# Altium PCB Industrial_IOT_Dev_Brd-v2.0.PcbDoc (part 3 of 5)
Units mil, origin at the board's own origin, x right, y up, seen from the top; angles counter-clockwise.
Board outline 3543.31 x 4724.41 mil, 2 copper layers (Top Layer, Bottom Layer), stack 61.889 mil thick; 159 components, 96 nets, 479 pads, 141 vias.
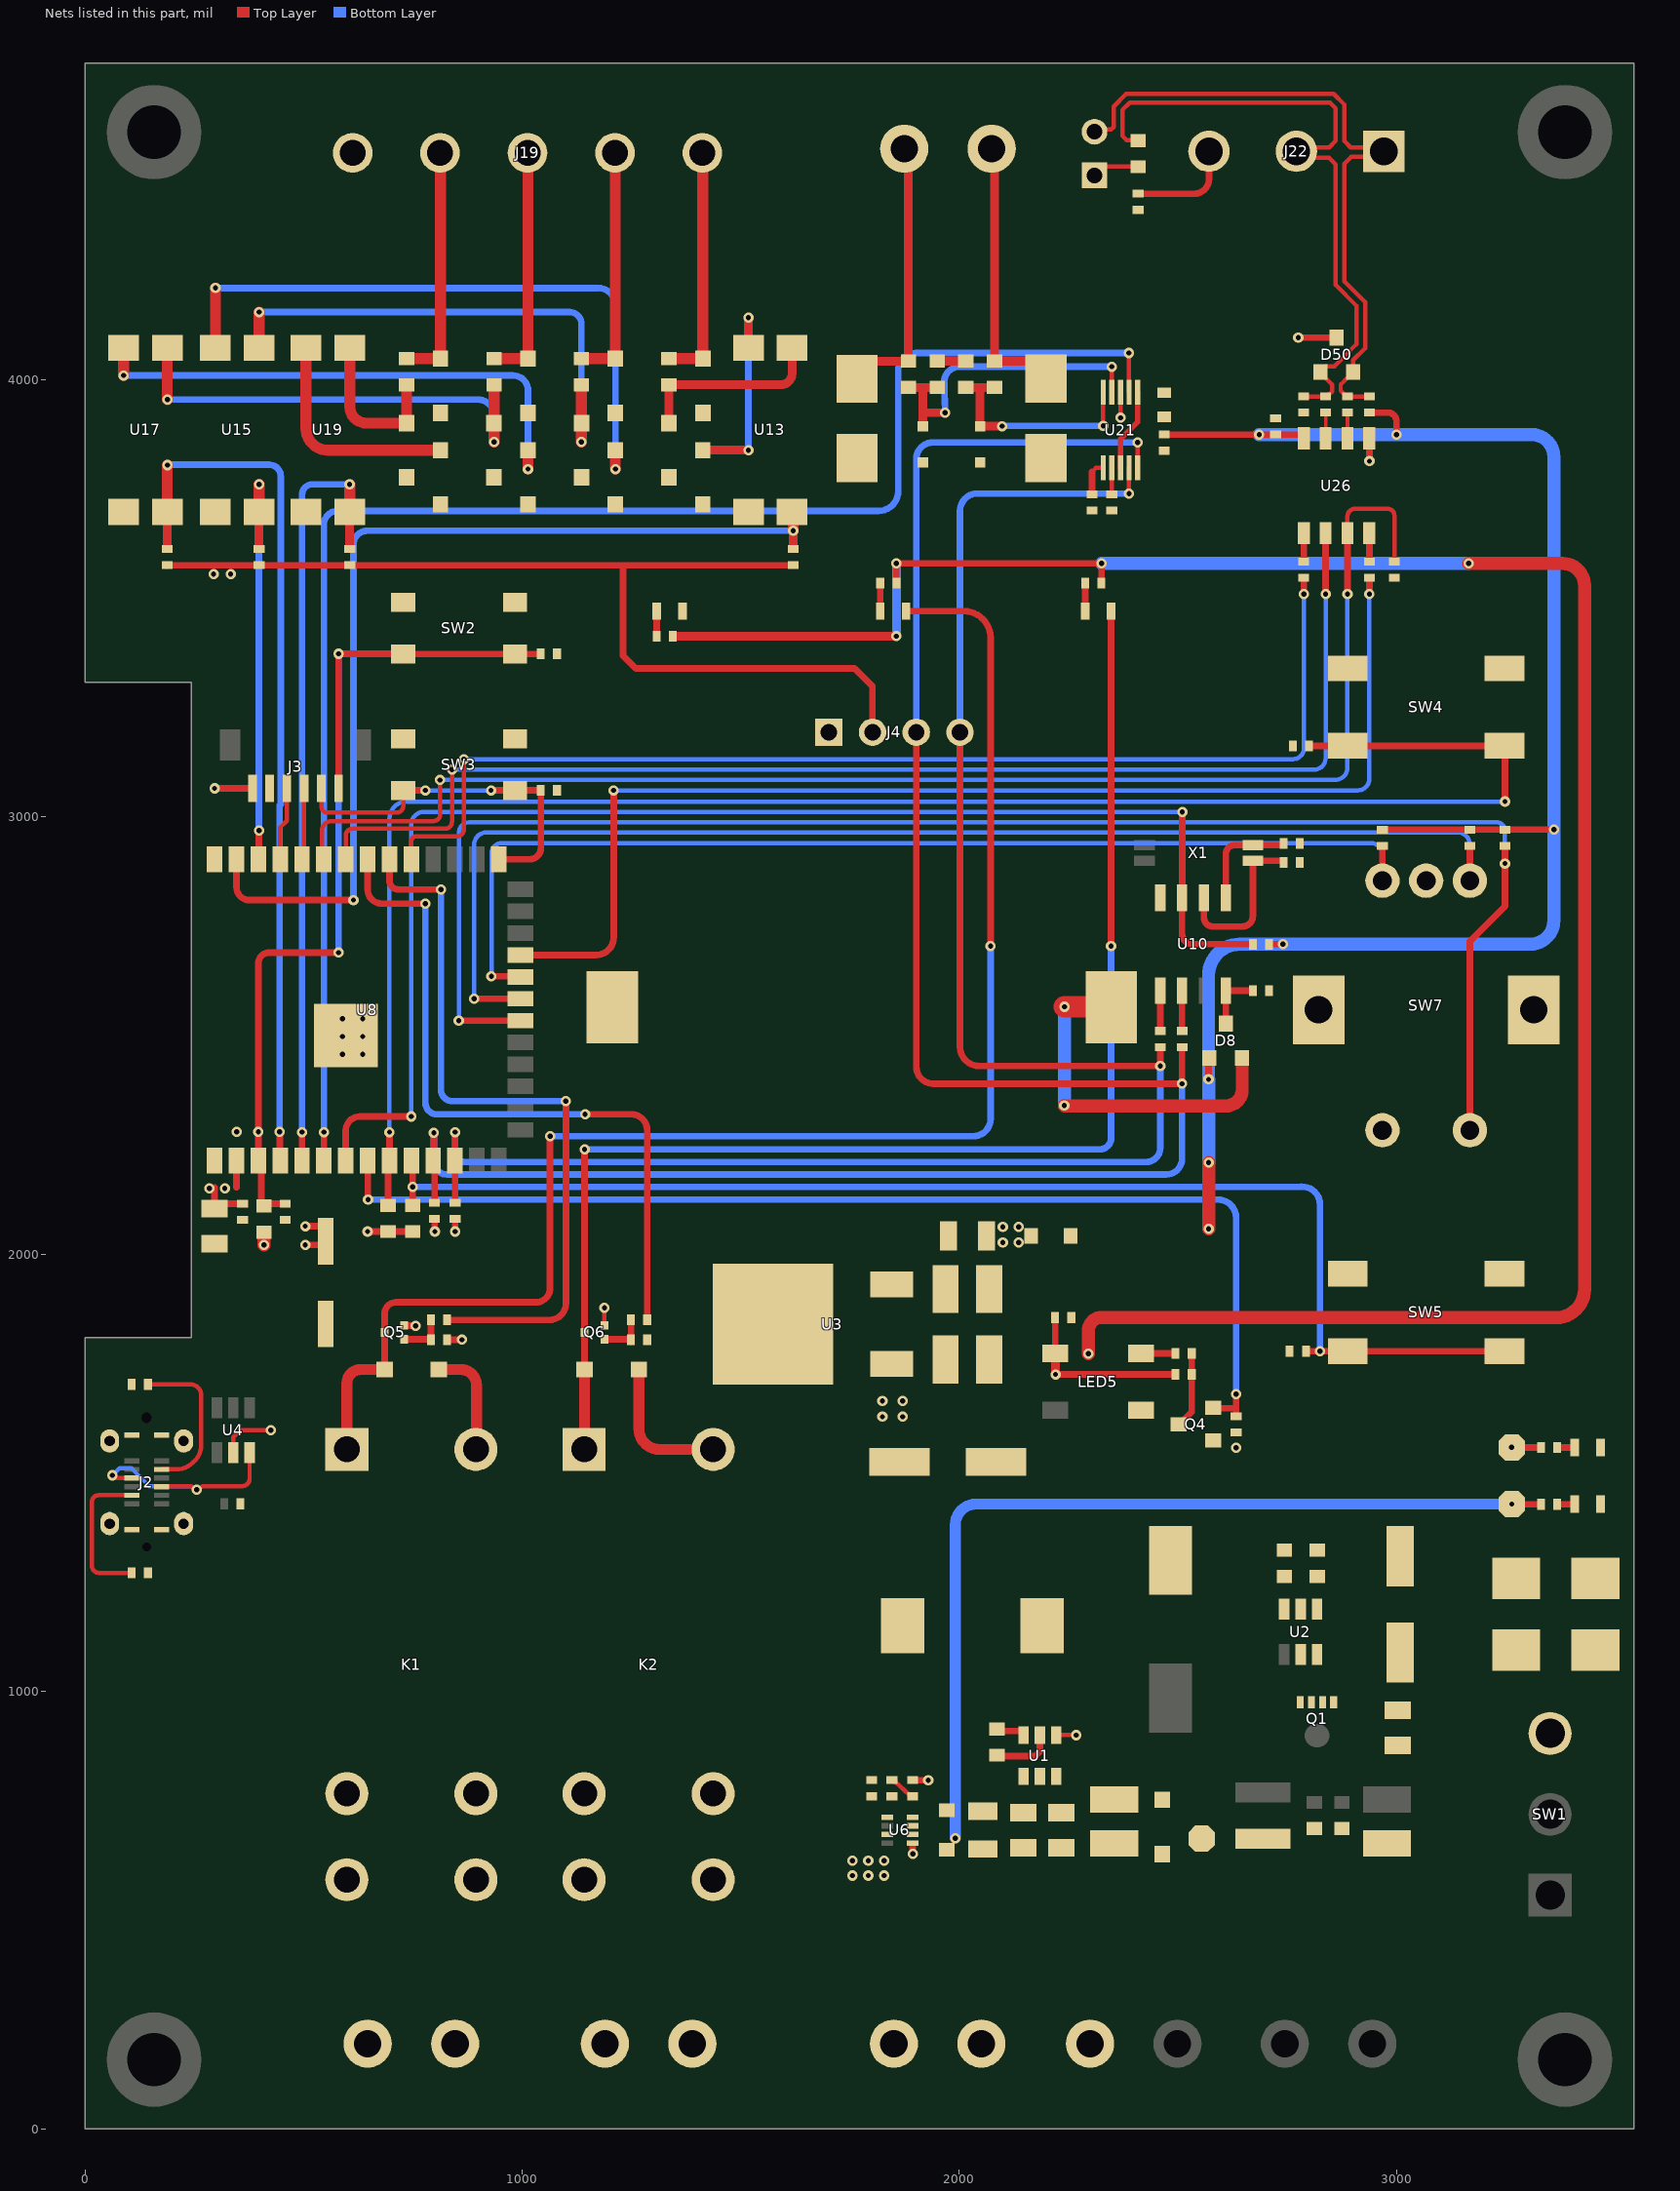
[diagram p2: the nets of this part, all layers, seen from the top]

## Part data (continued)
R8: library part RC0402FR-07499RL, "RES 499 OHM 1% 1/16W 0402", Case Code (Imperial)=0402, Case Code (Metric)=1005, LCSC Part Number=C137970, Manufacturer=Yageo, Max Operating Temperature=155°C, Max Power Dissipation=63mW, Min Operating Temperature=-55°C, Package Quantity=1, Power Rating=62.5mW, Resistance Tolerance=1%, Resistor Type="Thick Film", Supplier Part Number 1=603-RC0402FR-07499RL, Temperature Coefficient=100ppm/°C, Voltage Rating=50V, Case/Package=0402, Category="Chip SMD Resistors", ComponentLink1Description=https://datasheet.ciiva.com/2453/pyu-r-int-thick-7-2453539.pdf?src-supplier=Digi-Key, ComponentLink1URL=https://datasheet.ciiva.com/2453/pyu-r-int-thick-7-2453539.pdf?src-supplier=Digi-Key, ComponentLink2Description=https://datasheet.ciiva.com/2453/pyu-r-int-thick-7-2453540.pdf?src-supplier=Digi-Key, ComponentLink2URL=https://datasheet.ciiva.com/2453/pyu-r-int-thick-7-2453540.pdf?src-supplier=Digi-Key, ComponentLink3Description=https://datasheet.ciiva.com/2453/pyu-r-int-thick-7-2453538.pdf?src-supplier=Digi-Key, ComponentLink3URL=https://datasheet.ciiva.com/2453/pyu-r-int-thick-7-2453538.pdf?src-supplier=Digi-Key, Construction=Rectangular, Depth=0.5mm, Features="Moisture Resistant", Height=0.016inch, Lead Free="Lead Free", Length=1mm, Manufacturer Part Number=RC0402FR-07499RL, Military Standard=Not, Number of Terminations=2, Packaging="Tape and Reel", Pricing 1="1=0.10000, 10=0.01200, 50=0.01200, 100=0.00500, 1000=0.00300, 10000=0.00100 (USD)", REACH SVHC="No SVHC", Resistance=499R, RoHS=Yes, RoHS Compliant=Yes, Series=RC, Size Code=0402, Stock 1=936879, Supplier 1=Mouser, Termination=SMD/SMT, Tolerance=1%, Voltage Rating (DC)=50V, Width=0.02inch
R12: library part RC0402FR-07240RL, "RES 240 OHM 1% 1/16W 0402", Case Code (Imperial)=0402, Case Code (Metric)=1005, LCSC Part Number=C114755, Manufacturer=Yageo, Max Operating Temperature=155°C, Max Power Dissipation=63mW, Min Operating Temperature=-55°C, Package Quantity=1, Resistance Tolerance=1%, Resistor Type="Thick Film", Supplier Part Number 1=603-RC0402FR-07240RL, Temperature Coefficient=100ppm/°C, Voltage Rating=50V, Case/Package=0402, ComponentLink1Description=https://datasheet.ciiva.com/7849/1018594-7849915.pdf?src-supplier=Element14, ComponentLink1URL=https://datasheet.ciiva.com/7849/1018594-7849915.pdf?src-supplier=Element14, ComponentLink2Description=https://datasheet.ciiva.com/7849/1018594-7849916.pdf?src-supplier=Element14, ComponentLink2URL=https://datasheet.ciiva.com/7849/1018594-7849916.pdf?src-supplier=Element14, ComponentLink3Description=https://datasheet.ciiva.com/2519/pyu-r-int-thick-7-2519157.pdf?src-supplier=Digi-Key, ComponentLink3URL=https://datasheet.ciiva.com/2519/pyu-r-int-thick-7-2519157.pdf?src-supplier=Digi-Key, ComponentLink4Description=https://datasheet.ciiva.com/2519/pyu-r-int-thick-7-2519158.pdf?src-supplier=Digi-Key, ComponentLink4URL=https://datasheet.ciiva.com/2519/pyu-r-int-thick-7-2519158.pdf?src-supplier=Digi-Key, ComponentLink5Description=https://datasheet.ciiva.com/2519/pyu-r-int-thick-7-2519156.pdf?src-supplier=Digi-Key, ComponentLink5URL=https://datasheet.ciiva.com/2519/pyu-r-int-thick-7-2519156.pdf?src-supplier=Digi-Key, ComponentLink6Description=https://datasheet.ciiva.com/12669/pyu-rc0402-51-rohs-l-6-r-12669689.pdf?src-supplier=Mouser, ComponentLink6URL=https://datasheet.ciiva.com/12669/pyu-rc0402-51-rohs-l-6-r-12669689.pdf?src-supplier=Mouser, ComponentLink7Description=https://datasheet.ciiva.com/17419/pyu-rc0402-51-rohs-l-6-r-17419482.pdf?src-supplier=Future+Electronics, ComponentLink7URL=https://datasheet.ciiva.com/17419/pyu-rc0402-51-rohs-l-6-r-17419482.pdf?src-supplier=Future+Electronics, Construction=Rectangular, Depth=0.5mm, Features="Moisture Resistant", Height=0.016inch, Item Type=Resistors, Lead Free="Lead Free", Length=1mm, Manufacturer Part Number=RC0402FR-07240RL, Military Standard=Not, Number of Terminations=2, Packaging="Tape and Reel", Power Rating=63mW, Pricing 1="1=0.10000, 10=0.01200, 50=0.01200, 100=0.00500, 1000=0.00300, 10000=0.00100 (USD)", REACH SVHC=Unknown, Resistance=240R, RoHS=Yes, RoHS Compliant=Yes, Series=RC, Size Code=0402, Stock 1=1903202, Supplier 1=Mouser, Termination=SMD/SMT, Tolerance=1%, Voltage Rating (DC)=50V, Width=0.02inch
R13 R14: library part RC0402FR-075K1L, "RES 5.1K OHM 1% 1/16W 0402", Case Code (Imperial)=0402, Case Code (Metric)=1005, LCSC Part Number=C105872, Manufacturer=Yageo, Max Operating Temperature=155°C, Max Power Dissipation=63mW, Min Operating Temperature=-55°C, Package Quantity=1, Resistance=5.1kR, Resistance Tolerance=1%, Resistor Type="Thick Film", Temperature Coefficient=100ppm/°C, Voltage Rating=50V, Case/Package=0402, Category="Chip SMD Resistors", ComponentLink1Description=https://datasheet.ciiva.com/7983/1018594-7983519.pdf?src-supplier=Element14, ComponentLink1URL=https://datasheet.ciiva.com/7983/1018594-7983519.pdf?src-supplier=Element14, ComponentLink2Description=https://datasheet.ciiva.com/46394/1018594-46394936.pdf?src-supplier=Element14, ComponentLink2URL=https://datasheet.ciiva.com/46394/1018594-46394936.pdf?src-supplier=Element14, ComponentLink3Description=https://datasheet.ciiva.com/2453/pyu-r-int-thick-7-2453401.pdf?src-supplier=Digi-Key, ComponentLink3URL=https://datasheet.ciiva.com/2453/pyu-r-int-thick-7-2453401.pdf?src-supplier=Digi-Key, ComponentLink4Description=https://datasheet.ciiva.com/2453/pyu-r-int-thick-7-2453402.pdf?src-supplier=Digi-Key, ComponentLink4URL=https://datasheet.ciiva.com/2453/pyu-r-int-thick-7-2453402.pdf?src-supplier=Digi-Key, ComponentLink5Description=https://datasheet.ciiva.com/2453/pyu-r-int-thick-7-2453400.pdf?src-supplier=Digi-Key, ComponentLink5URL=https://datasheet.ciiva.com/2453/pyu-r-int-thick-7-2453400.pdf?src-supplier=Digi-Key, ComponentLink6Description=https://datasheet.ciiva.com/12558/pyu-rc0402-51-rohs-l-6-r-8721-12558460.pdf?src-supplier=Mouser, ComponentLink6URL=https://datasheet.ciiva.com/12558/pyu-rc0402-51-rohs-l-6-r-8721-12558460.pdf?src-supplier=Mouser, ComponentLink7Description=https://datasheet.ciiva.com/16744/pyu-rc0402-51-rohs-l-6-r-16744283.pdf?src-supplier=Future+Electronics, ComponentLink7URL=https://datasheet.ciiva.com/16744/pyu-rc0402-51-rohs-l-6-r-16744283.pdf?src-supplier=Future+Electronics, ComponentLink8Description=https://datasheet.ciiva.com/15189/getdatasheetpartid-323636-15189493.pdf?src-supplier=Verical, ComponentLink8URL=https://datasheet.ciiva.com/15189/getdatasheetpartid-323636-15189493.pdf?src-supplier=Verical, Construction=Rectangular, Depth=0.5mm, Features="Moisture Resistant", Height=0.016inch, Item Type=Resistor, Lead Free="Lead Free", Length=1mm, Manufacturer Part Number=RC0402FR-075K1L, Military Standard=Not, Number of Terminations=2, Packaging="Tape and Reel", Power Rating=63mW, Pricing 1="10000=0.00085 (USD)", RoHS=Yes, RoHS Compliant=Yes, Series=RC, Stock 1=65000, Supplier 1=Avnet, Supplier Part Number 1=RC0402FR-075K1L, Technology="THICK FILM", Termination=SMD/SMT, Tolerance=1%, Voltage Rating (DC)=50V, Width=0.02inch, Working Voltage=50V
R17: library part RC0402FR-073K3L, "RES 3.3K OHM 1% 1/16W 0402", Case Code (Imperial)=0402, Case Code (Metric)=1005, LCSC Part Number=C137992, Manufacturer=Yageo, Max Operating Temperature=155°C, Max Power Dissipation=63mW, Min Operating Temperature=-55°C, Package Quantity=1, Power Rating=62.5mW, Resistance=3.3kR, Resistance Tolerance=1%, Resistor Type="Thick Film", Supplier Part Number 1=603-RC0402FR-073K3L, Temperature Coefficient=100ppm/°C, Voltage Rating=50V, Case/Package=0402, Category="Chip SMD Resistors", ComponentLink1Description=https://datasheet.ciiva.com/11808/0900766b80c66297-11808441.pdf?src-supplier=RSComponents, ComponentLink1URL=https://datasheet.ciiva.com/11808/0900766b80c66297-11808441.pdf?src-supplier=RSComponents, ComponentLink2Description=https://datasheet.ciiva.com/46394/1018594-46394940.pdf?src-supplier=Element14, ComponentLink2URL=https://datasheet.ciiva.com/46394/1018594-46394940.pdf?src-supplier=Element14, ComponentLink3Description=https://datasheet.ciiva.com/2453/pyu-r-int-thick-7-2453395.pdf?src-supplier=Digi-Key, ComponentLink3URL=https://datasheet.ciiva.com/2453/pyu-r-int-thick-7-2453395.pdf?src-supplier=Digi-Key, ComponentLink4Description=https://datasheet.ciiva.com/2453/pyu-r-int-thick-7-2453396.pdf?src-supplier=Digi-Key, ComponentLink4URL=https://datasheet.ciiva.com/2453/pyu-r-int-thick-7-2453396.pdf?src-supplier=Digi-Key, ComponentLink5Description=https://datasheet.ciiva.com/2453/pyu-r-int-thick-7-2453394.pdf?src-supplier=Digi-Key, ComponentLink5URL=https://datasheet.ciiva.com/2453/pyu-r-int-thick-7-2453394.pdf?src-supplier=Digi-Key, ComponentLink6Description=https://datasheet.ciiva.com/16746/pyu-rc0402-51-rohs-l-6-r-16746361.pdf?src-supplier=Future+Electronics, ComponentLink6URL=https://datasheet.ciiva.com/16746/pyu-rc0402-51-rohs-l-6-r-16746361.pdf?src-supplier=Future+Electronics, Construction=Rectangular, Depth=0.5mm, Features="Moisture Resistant", Height=0.016inch, Item Type=Resistor, Lead Free="Lead Free", Length=1mm, Manufacturer Part Number=RC0402FR-073K3L, Military Standard=Not, Number of Pins=2, Number of Terminations=2, Packaging="Tape and Reel", Pricing 1="1=0.10000, 10=0.01400, 50=0.01400, 100=0.00600, 1000=0.00300, 5000=0.00200, 10000=0.00100 (USD)", REACH SVHC="No SVHC", RoHS=Yes, RoHS Compliant=Yes, Series=RC, Size Code=0402, Stock 1=2413047, Supplier 1=Mouser, Technology="THICK FILM", Termination=SMD/SMT, Tolerance=1%, Voltage Rating (DC)=50V, Width=0.5mm
R21: library part RC0402FR-071KL, "RES 1K OHM 1% 1/16W 0402", Case Code (Imperial)=0402, Case Code (Metric)=1005, LCSC Part Number=C106235, Manufacturer=Yageo, Max Operating Temperature=155°C, Max Power Dissipation=63mW, Min Operating Temperature=-55°C, Power Rating=62.5mW, Resistance=1kR, Resistance Tolerance=1%, Resistor Type="Thick Film", Temperature Coefficient=100ppm/°C, Voltage Rating=50V, Case/Package=0402, Category="Chip SMD Resistors", ComponentLink1Description=https://datasheet.ciiva.com/11819/0900766b80c66297-11819477.pdf?src-supplier=RSComponents, ComponentLink1URL=https://datasheet.ciiva.com/11819/0900766b80c66297-11819477.pdf?src-supplier=RSComponents, ComponentLink2Description=https://datasheet.ciiva.com/7983/1018594-7983502.pdf?src-supplier=Element14, ComponentLink2URL=https://datasheet.ciiva.com/7983/1018594-7983502.pdf?src-supplier=Element14, ComponentLink3Description=https://datasheet.ciiva.com/22747/1018594-22747513.pdf?src-supplier=Element14, ComponentLink3URL=https://datasheet.ciiva.com/22747/1018594-22747513.pdf?src-supplier=Element14, ComponentLink4Description=https://datasheet.ciiva.com/12666/pyu-rc0402-51-rohs-l-6-r-12666741.pdf?src-supplier=Mouser, ComponentLink4URL=https://datasheet.ciiva.com/12666/pyu-rc0402-51-rohs-l-6-r-12666741.pdf?src-supplier=Mouser, ComponentLink5Description=https://datasheet.ciiva.com/7849/1018594-7849869.pdf?src-supplier=Element14, ComponentLink5URL=https://datasheet.ciiva.com/7849/1018594-7849869.pdf?src-supplier=Element14, ComponentLink6Description=https://datasheet.ciiva.com/7849/1018594-7849871.pdf?src-supplier=Element14, ComponentLink6URL=https://datasheet.ciiva.com/7849/1018594-7849871.pdf?src-supplier=Element14, ComponentLink7Description=https://datasheet.ciiva.com/17063/pyu-rc0402-51-rohs-l-6-r-17063193.pdf?src-supplier=Future+Electronics, ComponentLink7URL=https://datasheet.ciiva.com/17063/pyu-rc0402-51-rohs-l-6-r-17063193.pdf?src-supplier=Future+Electronics, Construction=Rectangular, Depth=0.5mm, Features="Moisture Resistant", Height=0.32mm, Item Type=Resistor, Lead Free="Lead Free", Length=1mm, Manufacturer Part Number=RC0402FR-071KL, Military Standard=Not, Number of Pins=2, Number of Terminations=2, Packaging="Tape and Reel", Pricing 1="10000=0.00085, 20000=0.00087, 40000=0.00084, 60000=0.00083, 80000=0.00079, 100000=0.00078, 1000000=0.00076 (USD)", Reach SVHC Compliant=Yes, RoHS=Yes, RoHS Compliant=Yes, Series=RC, Size Code=0402, Stock 1=13030000, Supplier 1=Avnet, Supplier Part Number 1=RC0402FR-071KL, Technology="THICK FILM", Termination=SMD/SMT, Tolerance=1%, Voltage Rating (DC)=50V, Width=0.5mm
R24: library part RT0402BRD07100KL, "RES SMD 100K OHM 0.1% 1/16W 0402", LCSC Part Number=C852472, Manufacturer=Yageo, Supplier Part Number=YAG1343CT-ND, Voltage Rating (DC)=50V, Category="Chip SMD Resistors", ComponentLink1Description=https://datasheet.ciiva.com/12724/pyu-rt-1-to-0-05-rohs-l-4-12724954.pdf?src-supplier=Mouser, ComponentLink1URL=https://datasheet.ciiva.com/12724/pyu-rt-1-to-0-05-rohs-l-4-12724954.pdf?src-supplier=Mouser, Item Type=Resistor, Manufacturer Part Number=RT0402BRD07100KL, Pricing="1=0.16, 10=0.121, 50=0.0958, 100=0.0859, 500=0.0654, 1000=0.0578, 5000=0.04283 (USD)", RoHS=Yes, Stock=62932, Supplier=Digikey
R28 R35 R40: library part RC0603FR-0710KL, "RES SMD 10K Ohm 1% 1/10W 0603", Case Code (Imperial)=0603, Case Code (Metric)=1608, LCSC Part Number=C98220, Manufacturer=Yageo, Max Operating Temperature=155°C, Max Power Dissipation=100mW, Min Operating Temperature=-55°C, Resistance=10kR, Resistance Tolerance=1%, Resistor Type="Thick Film", Supplier Part Number 1=311-10.0KHRCT-ND, Temperature Coefficient=100ppm/°C, Voltage Rating=75V, Voltage Rating (DC)=50V, Case/Package=0603, Category="Chip SMD Resistors", ComponentLink1Description=https://datasheet.ciiva.com/7660/38590-7660789.pdf?src-supplier=Element14, ComponentLink1URL=https://datasheet.ciiva.com/7660/38590-7660789.pdf?src-supplier=Element14, ComponentLink2Description=https://datasheet.ciiva.com/7983/443971-7983596.pdf?src-supplier=Element14, ComponentLink2URL=https://datasheet.ciiva.com/7983/443971-7983596.pdf?src-supplier=Element14, ComponentLink3Description=https://datasheet.ciiva.com/22747/443971-22747519.pdf?src-supplier=Element14, ComponentLink3URL=https://datasheet.ciiva.com/22747/443971-22747519.pdf?src-supplier=Element14, ComponentLink4Description=https://datasheet.ciiva.com/46440/1868787-46440891.pdf?src-supplier=Element14, ComponentLink4URL=https://datasheet.ciiva.com/46440/1868787-46440891.pdf?src-supplier=Element14, ComponentLink5Description=https://datasheet.ciiva.com/7746/1738695-7746239.pdf?src-supplier=Element14, ComponentLink5URL=https://datasheet.ciiva.com/7746/1738695-7746239.pdf?src-supplier=Element14, ComponentLink6Description=https://datasheet.ciiva.com/15189/getdatasheetpartid-409289-15189591.pdf?src-supplier=Verical, ComponentLink6URL=https://datasheet.ciiva.com/15189/getdatasheetpartid-409289-15189591.pdf?src-supplier=Verical, Construction=Rectangular, Depth=0.8mm, Features="Moisture Resistant", Height=0.45mm, Item Type=Resistor, Lead Free="Lead Free", Lead Pitch=0.3mm, Length=1.6mm, Manufacturer Part Number=RC0603FR-0710KL, Military Standard=Not, Number of Pins=2, Number of Terminations=2, Packaging="Tape and Reel", Power Rating=100mW, Pricing 1="1=0.10000, 10=0.02400, 100=0.00970, 1000=0.00436, 2500=0.00378 (USD)", REACH SVHC=Unknown, RoHS=Yes, RoHS Compliant=Yes, Series=RC, Size Code=0603, Stock 1=25249139, Supplier 1=Digi-Key, Termination=SMD/SMT, Tolerance=1%, Weight=7.1E-05oz, Width=0.8mm
R33 R34 R41 R42 R43 R46 R52 R53 R64 R68 R72 R76 R117 R120: library part RC0402FR-074K7L, "RES 4.7K OHM 1% 1/16W 0402", Case Code (Imperial)=0402, Case Code (Metric)=1005, LCSC Part Number=C105871, Manufacturer=Yageo, Max Operating Temperature=155°C, Max Power Dissipation=63mW, Min Operating Temperature=-55°C, Power Rating=62.5mW, Resistance=4.7kR, Resistance Tolerance=1%, Resistor Type="Thick Film", Temperature Coefficient=100ppm/°C, Voltage Rating=50V, Case/Package=0402, Category="Chip SMD Resistors", ComponentLink1Description=https://datasheet.ciiva.com/22661/1686128-22661342.pdf?src-supplier=Element14, ComponentLink1URL=https://datasheet.ciiva.com/22661/1686128-22661342.pdf?src-supplier=Element14, ComponentLink2Description=https://datasheet.ciiva.com/7850/1018594-7850022.pdf?src-supplier=Element14, ComponentLink2URL=https://datasheet.ciiva.com/7850/1018594-7850022.pdf?src-supplier=Element14, ComponentLink3Description=https://datasheet.ciiva.com/7850/1018594-7850023.pdf?src-supplier=Element14, ComponentLink3URL=https://datasheet.ciiva.com/7850/1018594-7850023.pdf?src-supplier=Element14, ComponentLink4Description=https://datasheet.ciiva.com/15215/getdatasheetpartid-328119-15215035.pdf?src-supplier=Verical, ComponentLink4URL=https://datasheet.ciiva.com/15215/getdatasheetpartid-328119-15215035.pdf?src-supplier=Verical, Construction=Rectangular, Depth=0.5mm, Features="Moisture Resistant", Height=0.32mm, Height - Seated (Max)=0.016inch, Item Type=Resistor, Lead Free="Lead Free", Length=1mm, Manufacturer Part Number=RC0402FR-074K7L, Military Standard=Not, Number of Pins=2, Number of Terminations=2, Packaging="Tape and Reel", Pricing 1="10000=0.00085 (USD)", Reach SVHC Compliant=Yes, RoHS=Yes, RoHS Compliant=Yes, Series=RC, Size Code=0402, Stock 1=2420000, Supplier 1=Avnet, Supplier Part Number 1=RC0402FR-074K7L, Termination=SMD/SMT, Tolerance=1%, Voltage Rating (DC)=50V, Width=0.5mm
R38: library part RC0402JR-0775RL, "RES 75 OHM 5% 1/16W 0402", Case Code (Imperial)=0402, Case Code (Metric)=1005, LCSC Part Number=C137841, Manufacturer=Yageo, Max Operating Temperature=155°C, Max Power Dissipation=63mW, Min Operating Temperature=-55°C, Power Rating=62.5mW, Resistance Tolerance=5%, Resistor Type="Thick Film", Supplier Part Number=311-75JRCT-ND, Temperature Coefficient=100ppm/°C, Voltage Rating=50V, Case/Package=0402, ComponentLink1Description=https://datasheet.ciiva.com/7983/1018594-7983612.pdf?src-supplier=Element14, ComponentLink1URL=https://datasheet.ciiva.com/7983/1018594-7983612.pdf?src-supplier=Element14, ComponentLink2Description=https://datasheet.ciiva.com/17082/pyu-rc0402-51-rohs-l-6-r-17082239.pdf?src-supplier=Future+Electronics, ComponentLink2URL=https://datasheet.ciiva.com/17082/pyu-rc0402-51-rohs-l-6-r-17082239.pdf?src-supplier=Future+Electronics, Contact Plating=Tin,Lead, Features="Moisture Resistant", Height=0.35mm, Item Type=Resistor, Lead Free="Lead Free", Length=1mm, Manufacturer Part Number=RC0402JR-0775RL, Number of Terminations=2, Packaging="Tape and Reel", Pins=2, Pricing="1=0.1, 10=0.018, 50=0.0102, 100=0.0083, 500=0.00528, 1000=0.00444, 5000=0.00307 (USD)", Reach SVHC Compliant=No, RoHS=Yes, RoHS Compliant=Yes, Series=RC, Stock=2993323, Supplier=Digikey, Termination=SMD/SMT, Tolerance=5%, Voltage Rating (DC)=50V, Width=0.5mm
R44 R45 R115 R116 R118 R119 R121: library part RC0402FR-070RL, "RES 0 OHM JUMPER 1/16W 0402", Case Code (Imperial)=0402, Case Code (Metric)=1005, LCSC Part Number=C106231, Manufacturer=Yageo, Max Operating Temperature=155°C, Max Power Dissipation=63mW, Min Operating Temperature=-55°C, Power Rating=62.5mW, Resistor Type="Thick Film", Supplier Part Number 1=603-RC0402FR-070RL, Temperature Coefficient=200ppm/°C, Tolerance=1%, Voltage Rating=50V, Case/Package=0402, ComponentLink1Description=https://datasheet.ciiva.com/8896/pyu-rc0402-51-rohs-l-6-8896149.pdf?src-supplier=Avnet, ComponentLink1URL=https://datasheet.ciiva.com/8896/pyu-rc0402-51-rohs-l-6-8896149.pdf?src-supplier=Avnet, ComponentLink2Description=https://datasheet.ciiva.com/16790/pyu-rc0402-51-rohs-l-6-r-16790444.pdf?src-supplier=Future+Electronics, ComponentLink2URL=https://datasheet.ciiva.com/16790/pyu-rc0402-51-rohs-l-6-r-16790444.pdf?src-supplier=Future+Electronics, Contact Plating=Tin,Matte, Features="Moisture Resistant", Height=0.35mm, Item Type=Resistors, Lead Free="Lead Free", Length=1mm, Manufacturer Part Number=RC0402FR-070RL, Mount="Surface Mount", Number of Terminations=2, Packaging="Tape and Reel", Pricing 1="1=0.10000, 10=0.01400, 50=0.01400, 100=0.00600, 1000=0.00300, 5000=0.00200, 10000=0.00100 (USD)", Radiation Hardening=No, Resistance=0R, RoHS=Yes, RoHS Compliant=Yes, Series=RC, Size Code=0402, Stock 1=8556842, Supplier 1=Mouser, Termination=SMD/SMT, Width=0.5mm
R56 R57: library part RC0402FR-0747KL, "RES 47K OHM 1% 1/16W 0402", Case Code (Imperial)=0402, Case Code (Metric)=1005, LCSC Part Number=C93943, Manufacturer=Yageo, Max Operating Temperature=155°C, Max Power Dissipation=63mW, Min Operating Temperature=-55°C, Package Quantity=1, Power Rating=62.5mW, Resistance=47kR, Resistance Tolerance=1%, Resistor Type="Thick Film", Temperature Coefficient=100ppm/°C, Voltage Rating=50V, Case/Package=0402, Category="Chip SMD Resistors", ComponentLink1Description=https://datasheet.ciiva.com/46412/1018594-46412839.pdf?src-supplier=Element14, ComponentLink1URL=https://datasheet.ciiva.com/46412/1018594-46412839.pdf?src-supplier=Element14, ComponentLink2Description=https://datasheet.ciiva.com/2453/pyu-r-int-thick-7-2453389.pdf?src-supplier=Digi-Key, ComponentLink2URL=https://datasheet.ciiva.com/2453/pyu-r-int-thick-7-2453389.pdf?src-supplier=Digi-Key, ComponentLink3Description=https://datasheet.ciiva.com/2453/pyu-r-int-thick-7-2453390.pdf?src-supplier=Digi-Key, ComponentLink3URL=https://datasheet.ciiva.com/2453/pyu-r-int-thick-7-2453390.pdf?src-supplier=Digi-Key, ComponentLink4Description=https://datasheet.ciiva.com/2453/pyu-r-int-thick-7-2453388.pdf?src-supplier=Digi-Key, ComponentLink4URL=https://datasheet.ciiva.com/2453/pyu-r-int-thick-7-2453388.pdf?src-supplier=Digi-Key, ComponentLink5Description=https://datasheet.ciiva.com/15189/getdatasheetpartid-323748-15189466.pdf?src-supplier=Verical, ComponentLink5URL=https://datasheet.ciiva.com/15189/getdatasheetpartid-323748-15189466.pdf?src-supplier=Verical, ComponentLink6Description=https://datasheet.ciiva.com/16793/pyu-rc0402-51-rohs-l-6-r-16793430.pdf?src-supplier=Future+Electronics, ComponentLink6URL=https://datasheet.ciiva.com/16793/pyu-rc0402-51-rohs-l-6-r-16793430.pdf?src-supplier=Future+Electronics, Construction=Rectangular, Depth=0.5mm, Features="Moisture Resistant", Height=0.016inch, Item Type=Resistor, Lead Free="Lead Free", Length=1mm, Manufacturer Part Number=RC0402FR-0747KL, Military Standard=Not, Number of Terminations=2, Packaging="Tape and Reel", Pricing 1="10000=0.00085, 20000=0.00087, 40000=0.00084, 60000=0.00083, 80000=0.00079, 100000=0.00078, 1000000=0.00076 (USD)", RoHS=Yes, RoHS Compliant=Yes, Series=RC, Size Code=0402, Stock 1=680000, Supplier 1=Avnet, Supplier Part Number 1=RC0402FR-0747KL, Termination=SMD/SMT, Tolerance=1%, Width=0.02inch
R60 R61: library part RC0402FR-07680RL, "RES 680 OHM 1% 1/16W 0402", Case Code (Imperial)=0402, Case Code (Metric)=1005, Manufacturer=Yageo, Max Operating Temperature=155°C, Max Power Dissipation=63mW, Min Operating Temperature=-55°C, Resistance Tolerance=1%, Resistor Type="Thick Film", Supplier Part Number 1=7948052, Temperature Coefficient=100ppm/°C, Voltage Rating=50V, Case/Package=0402, Category="Chip SMD Resistors", ComponentLink1Description=https://datasheet.ciiva.com/12667/pyu-rc0402-51-rohs-l-6-r-12667916.pdf?src-supplier=Mouser, ComponentLink1URL=https://datasheet.ciiva.com/12667/pyu-rc0402-51-rohs-l-6-r-12667916.pdf?src-supplier=Mouser, ComponentLink2Description=https://datasheet.ciiva.com/7850/1018594-7850071.pdf?src-supplier=Element14, ComponentLink2URL=https://datasheet.ciiva.com/7850/1018594-7850071.pdf?src-supplier=Element14, ComponentLink3Description=https://datasheet.ciiva.com/7850/1018594-7850070.pdf?src-supplier=Element14, ComponentLink3URL=https://datasheet.ciiva.com/7850/1018594-7850070.pdf?src-supplier=Element14, ComponentLink4Description=https://datasheet.ciiva.com/17042/pyu-rc0402-51-rohs-l-6-r-17042399.pdf?src-supplier=Future+Electronics, ComponentLink4URL=https://datasheet.ciiva.com/17042/pyu-rc0402-51-rohs-l-6-r-17042399.pdf?src-supplier=Future+Electronics, Construction=Rectangular, Depth=0.5mm, Features="Moisture Resistant", Item Type=Resistor, Lead Free="Lead Free", Length=1mm, Manufacturer Part Number=RC0402FR-07680RL, Military Standard=Not, Number of Terminations=2, Packaging="Tape and Reel", Power Rating=63mW, Pricing 1="10000=0.0011, 100000=0.0011, 300000=0.001, 750000=0.001, 2000000=0.0009 (USD)", Reach SVHC Compliant=No, Resistance=680R, RoHS=Yes, RoHS Compliant=Yes, Series=RC, Size Code=0402, Stock 1=5080000, Supplier 1="Future Electronics", Termination=SMD/SMT, Tolerance=1%, Voltage Rating (AC)=50V
R66 R70 R74 R78: library part RC0603FR-071K5L, "RES 1.5K OHM 1% 1/10W 0603", Case Code (Imperial)=0603, Case Code (Metric)=1608, LCSC Part Number=C114668, Manufacturer=Yageo, Max Operating Temperature=155°C, Max Power Dissipation=100mW, Min Operating Temperature=-55°C, Package Quantity=1, Resistance=1.5kR, Resistance Tolerance=1%, Resistor Type="Thick Film", Temperature Coefficient=100ppm/°C, Voltage Rating=50V, Case/Package=0603, Category="Chip SMD Resistors", Construction=Rectangular, Depth=0.8mm, Features="Moisture Resistant", Height=0.022inch, Item Type=Resistor, Lead Free="Lead Free", Length=0.063inch, Manufacturer Part Number=RC0603FR-071K5L, Military Standard=Not, Number of Pins=2, Number of Terminations=2, Packaging="Tape and Reel", Power Rating=100mW, Pricing 1="1=0.00160, 5000=0.00160 (USD)", REACH SVHC="No SVHC", RoHS=Yes, RoHS Compliant=Yes, Series=RC, Size Code=0603, Stock 1=15000, Supplier 1="Arrow Electronics", Supplier Part Number 1=RC0603FR-071K5L, Termination=SMD/SMT, Tolerance=1%, Voltage Rating (DC)=50V, Width=0.031inch
R80 R84: library part RT0603BRD073K74L, "RES SMD 3.74KOHM 0.1% 1/10W 0603", LCSC Part Number=C861382, Manufacturer=Yageo, ComponentLink1Description=https://datasheet.ciiva.com/2585/pyu-rt-1-to-0-05-rohs-l-5-2585932.pdf?src-supplier=Digikey, ComponentLink1URL=https://datasheet.ciiva.com/2585/pyu-rt-1-to-0-05-rohs-l-5-2585932.pdf?src-supplier=Digikey, ComponentLink2Description=https://datasheet.ciiva.com/12704/pyu-rt-1-to-0-05-rohs-l-4-12704766.pdf?src-supplier=Mouser, ComponentLink2URL=https://datasheet.ciiva.com/12704/pyu-rt-1-to-0-05-rohs-l-4-12704766.pdf?src-supplier=Mouser, Item Type=Resistors, Manufacturer Part Number=RT0603BRD073K74L, Pricing="1=0.14, 10=0.104, 50=0.0822, 100=0.0737, 500=0.05612, 1000=0.04959 (USD)", RoHS=Yes, Stock=18903, Supplier=Digikey
R82 R86: library part RT0603BRD071K8L, "RES SMD 1.8K OHM 0.1% 1/10W 0603", Case Code (Imperial)=0603, Case Code (Metric)=1608, LCSC Part Number=C705745, Manufacturer=Yageo, Max Operating Temperature=125°C, Max Power Dissipation=100mW, Min Operating Temperature=-55°C, Package Quantity=5000, Resistance=1.8kR, Resistor Type="Thin Film", Supplier Part Number 1=1991446P, Temperature Coefficient=25ppm/°C, Tolerance=0.1%, Voltage Rating=75V, Voltage Rating (DC)=50V, Case/Package=0603, Category="Chip SMD Resistors", ComponentLink1Description=https://datasheet.ciiva.com/12694/pyu-rt-1-to-0-05-rohs-l-4-12694842.pdf?src-supplier=Mouser, ComponentLink1URL=https://datasheet.ciiva.com/12694/pyu-rt-1-to-0-05-rohs-l-4-12694842.pdf?src-supplier=Mouser, ComponentLink2Description=https://datasheet.ciiva.com/2585/pyu-rt-1-to-0-05-rohs-l-4-2585762.pdf?src-supplier=Digi-Key, ComponentLink2URL=https://datasheet.ciiva.com/2585/pyu-rt-1-to-0-05-rohs-l-4-2585762.pdf?src-supplier=Digi-Key, Construction=Rectangular, Contact Plating=Tin,Matte, Depth=0.8mm, Features="Moisture Resistant", Height=0.022inch, Item Type=Resistor, Lead Free="Lead Free", Length=0.063inch, Manufacturer Part Number=RT0603BRD071K8L, Military Standard=Not, Number of Terminations=2, Packaging="Tape and Reel", Power Rating=100mW, Pricing 1="100=0.21900, 250=0.20400, 500=0.19000, 1000=0.17400 (GBP)", Radiation Hardening=No, RoHS=Yes, RoHS Compliant=Yes, Series=RT, Stock 1=3210, Supplier 1=Rs, Termination=SMD/SMT, Width=0.031inch
R122: library part RC0603FR-07120RL, "RES 120 OHM 1% 1/10W 0603", Case Code (Imperial)=0603, Case Code (Metric)=1608, LCSC Part Number=C114640, Manufacturer=Yageo, Max Operating Temperature=155°C, Max Power Dissipation=100mW, Min Operating Temperature=-55°C, Package Quantity=1, Resistance Tolerance=1%, Resistor Type="Thick Film", Supplier Part Number 1=311-120HRCT-ND, Temperature Coefficient=100ppm/°C, Voltage Rating=50V, Case/Package=0603, Category="Chip SMD Resistors", ComponentLink1Description=https://datasheet.ciiva.com/2553/pyu-r-int-thick-7-2553512.pdf?src-supplier=Digi-Key, ComponentLink1URL=https://datasheet.ciiva.com/2553/pyu-r-int-thick-7-2553512.pdf?src-supplier=Digi-Key, ComponentLink2Description=https://datasheet.ciiva.com/7746/443971-7746248.pdf?src-supplier=Element14, ComponentLink2URL=https://datasheet.ciiva.com/7746/443971-7746248.pdf?src-supplier=Element14, ComponentLink3Description=https://datasheet.ciiva.com/2553/pyu-r-int-thick-7-2553513.pdf?src-supplier=Digi-Key, ComponentLink3URL=https://datasheet.ciiva.com/2553/pyu-r-int-thick-7-2553513.pdf?src-supplier=Digi-Key, ComponentLink4Description=https://datasheet.ciiva.com/7746/443971-7746249.pdf?src-supplier=Element14, ComponentLink4URL=https://datasheet.ciiva.com/7746/443971-7746249.pdf?src-supplier=Element14, ComponentLink5Description=https://datasheet.ciiva.com/2553/pyu-r-int-thick-7-2553514.pdf?src-supplier=Digi-Key, ComponentLink5URL=https://datasheet.ciiva.com/2553/pyu-r-int-thick-7-2553514.pdf?src-supplier=Digi-Key, ComponentLink6Description=https://datasheet.ciiva.com/46395/443971-46395021.pdf?src-supplier=Element14, ComponentLink6URL=https://datasheet.ciiva.com/46395/443971-46395021.pdf?src-supplier=Element14, Construction=Rectangular, Depth=0.8mm, Features="Moisture Resistant", Height=0.022inch, Item Type=Resistor, Lead Free="Lead Free", Length=1.6mm, Manufacturer Part Number=RC0603FR-07120RL, Military Standard=Not, Number of Pins=2, Number of Terminations=2, Packaging="Tape and Reel", Power Rating=100mW, Pricing 1="1=0.10000, 10=0.02400, 100=0.00970, 1000=0.00436, 2500=0.00378 (USD)", REACH SVHC="No SVHC", Resistance=120R, RoHS=Yes, RoHS Compliant=Yes, Series=RC, Size Code=0603, Stock 1=839061, Supplier 1=Digi-Key, Termination=SMD/SMT, Tolerance=1%, Voltage Rating (DC)=50V, Width=0.031inch
SW1: "3A Direct Insert Single Pole Double Throw (SPDT) 125V Black 10,000 times Plugin Slide Switches ROHS", LCSC Part Number=C319011, Manufacturer="XKB Connectivity", Package=Plugin, ComponentLink1Description=LCSC, ComponentLink1URL=https://www.lcsc.com/product-detail/Slide-Switches_XKB-Connection-SS-12D10L9_C319011.html, Item Type=Switch
SW2 SW3: "No NO 50mA 4.5mm 100000 260gf 12V -30℃~+85℃ 4.5mm 4.3mm Black Round Button Brick nogging SPST SMD Tactile Switches ROHS", LCSC Part Number=C381037, Manufacturer="XKB Connectivity", Package=Custom, ComponentLink1Description=LCSC, ComponentLink1URL=https://www.lcsc.com/product-detail/Tactile-Switches_XKB-Connectivity-TS-1109S-C-B_C381037.html, Item Type=Switch, Manufacturer Part Number=TS-1109S-C-B
SW4 SW5: "6mm 12mm Round Button 50mA Standing paste 6mm SPST 12V SMD,6x6mm Tactile Switches ROHS", LCSC Part Number=C455124, Manufacturer=XUNPU, Package=SMD,6x6mm, ComponentLink1Description=LCSC, ComponentLink1URL=https://www.lcsc.com/product-detail/Tactile-Switches_XUNPU-TS-1002S-12026C_C455124.html?s_z=n_TS-1002S-12026C, Item Type="Tactile Switch", Manufacturer Part Number=TS-1002S-12026C
SW7: "METAL SHAFT ENCODERS", LCSC Part Number=C361167, Manufacturer="Alps Electric", ComponentLink1Description=https://datasheet.ciiva.com/11807/0900766b80f4c221-11807942.pdf?src-supplier=Rs, ComponentLink1URL=https://datasheet.ciiva.com/11807/0900766b80f4c221-11807942.pdf?src-supplier=Rs, ComponentLink2Description=https://datasheet.ciiva.com/1310/1837001-1310650.pdf?src-supplier=Element14, ComponentLink2URL=https://datasheet.ciiva.com/1310/1837001-1310650.pdf?src-supplier=Element14, ComponentLink3Description=https://datasheet.ciiva.com/32416/03584604-32416390.pdf?src-supplier=Distrelec, ComponentLink3URL=https://datasheet.ciiva.com/32416/03584604-32416390.pdf?src-supplier=Distrelec, ComponentLink4Description=https://datasheet.ciiva.com/16204/878ec11-16204694.pdf?src-supplier=Onlinecomponents.com, ComponentLink4URL=https://datasheet.ciiva.com/16204/878ec11-16204694.pdf?src-supplier=Onlinecomponents.com, Item Type=Encoders, Lead Free=5697LeadFree, Manufacturer Part Number=EC11E1820402, Number of Positions=36NUMBER, Pricing="1=4.42, 5=3.992, 10=3.731, 25=3.4196, 40=3.1905, 80=3.00238, 230=2.74883, 440=2.57702, 945=2.4134 (USD)", RoHS=Yes, Stock=643, Supplier=Digikey
TP1 TP2 TP3: "Test Point ON", Item Type="TEST POINT"
U1: "IC REG BUCK 5V 2A TSOT26", LCSC Part Number=C2071056, Manufacturer=Diodes, Supplier Part Number 1=AP63205WU-7DICT-ND, Category="Voltage Regulators - Switching", Item Type=IC, Manufacturer Part Number=AP63205WU-7, Pricing 1="1=0.88, 10=0.776, 25=0.7292, 100=0.5952, 250=0.55284, 500=0.4705, 1000=0.3764 (USD)", RoHS=Yes, Stock 1=88525, Supplier 1=Digi-Key
U2: "OR Controller N+1 ORing Controller N-Channel 1:1 SOT-23-6", Case/Package=SOT-23-6, LCSC Part Number=C2941042, Manufacturer="Texas Instruments", Max Operating Temperature=125°C, Max Output current=5A, Max Supply Voltage=65V, Min Operating Temperature=-40°C, Min Supply Voltage=3.2V, Nominal Supply Current=80uA, Supplier Part Number=595-LM74700QDBVRQ1, Category="Power Management ICs", ComponentLink1Description=http://www.ti.com/general/docs/suppproductinfo.tsp?distId=10&amp;gotoUrl=http%3A%2F%2Fwww.ti.com%2Flit%2Fgpn%2Flm74700-q1&src-supplier=Digikey, ComponentLink1URL=http://www.ti.com/general/docs/suppproductinfo.tsp?distId=10&amp;gotoUrl=http%3A%2F%2Fwww.ti.com%2Flit%2Fgpn%2Flm74700-q1&src-supplier=Digikey, Height=1.45mm, Item Type=IC, Length=2.9mm, Manufacturer Part Number=LM74700QDBVRQ1, Mounting Technology="Surface Mount", Number of Outputs=1NUMBER, Pins=6NUMBER, Pricing="1=1.78, 10=1.6, 50=1.6, 100=1.28, 1000=0.877, 10000=0.756 (USD)", RoHS=Yes, RoHS Compliant=Yes, Series="Automotive, AEC-Q100", Stock=11505, Supplier=Mouser, Thickness=1.2mm, Turn-Off Delay Time=450ns, Turn-On Delay Time=1.4us, Width=1.6mm
U3: "IC REG LINEAR 3.3V 1.5A TO252-3", LCSC Part Number=C108723, Manufacturer=Diodes, ComponentLink1Description=http://www.mouser.com/ds/2/115/AP7363-247326.pdf?src-supplier=Mouser, ComponentLink1URL=http://www.mouser.com/ds/2/115/AP7363-247326.pdf?src-supplier=Mouser, ComponentLink2Description=https://datasheet.octopart.com/AP7363-33D-13-Diodes-Inc.-datasheet-141402625.pdf?src-supplier=Element14, ComponentLink2URL=https://datasheet.octopart.com/AP7363-33D-13-Diodes-Inc.-datasheet-141402625.pdf?src-supplier=Element14, ComponentLink3Description=http://www.diodes.com/datasheets/AP7363.pdf?src-supplier=Avnet, ComponentLink3URL=http://www.diodes.com/datasheets/AP7363.pdf?src-supplier=Avnet, ComponentLink4Description=https://www.diodes.com/assets/Datasheets/AP7363.pdf?src-supplier=Digikey, ComponentLink4URL=https://www.diodes.com/assets/Datasheets/AP7363.pdf?src-supplier=Digikey, ComponentLink5Description=https://datasheet.octopart.com/AP7363-33D-13-Diodes-Inc.-datasheet-17557726.pdf?src-supplier=SHENGYU+ELECTRONICS, ComponentLink5URL=https://datasheet.octopart.com/AP7363-33D-13-Diodes-Inc.-datasheet-17557726.pdf?src-supplier=SHENGYU+ELECTRONICS, Item Type=IC, Manufacturer Part Number=AP7363-33D-13, Pricing="1=0.92, 10=0.462, 50=0.462, 100=0.306, 1000=0.245, 10000=0.188 (USD)", RoHS=Yes, Stock=7040, Supplier=Mouser
U4: "6A 12V 150W 6V Unidirectional 5V SOT-23-6 ESD and Surge Protection (TVS/ESD) ROHS", LCSC Part Number=C2827654, Manufacturer="TECH PUBLIC", Package=SOT-23-6, ComponentLink1Description=LCSC, ComponentLink1URL=https://www.lcsc.com/product-detail/ESD-and-Surge-Protection-TVS-ESD_TECH-PUBLIC-USBLC6-2SC6_C2827654.html, Item Type=(TVS/ESD), Manufacturer Part Number=USBLC6-2SC6
U6: "1.6-V TO 5.5-V, 40-M, 2.5-A, LOW", LCSC Part Number=C3235557, Manufacturer="Texas Instruments", Supplier Part Number=595-TPS2116DRLR, Category="Voltage Supervisors", Item Type=IC, Manufacturer Part Number=TPS2116DRLR, Pricing="1=0.87, 10=0.736, 50=0.736, 100=0.565, 1000=0.394, 10000=0.336 (USD)", RoHS=No, RoHS Compliant=Yes, Stock=5096, Supplier=Mouser
U8: "SMD MODULE, ESP32-S3R8 WITH 3.3V", LCSC Part Number=C2913202, Manufacturer="Espressif Systems", Supplier Part Number 1=1965-ESP32-S3-WROOM-1-N16R8CT-ND, Category=Uncategorized, ComponentLink1Description=LCSC, ComponentLink1URL=https://www.lcsc.com/product-detail/WiFi-Modules_Espressif-Systems-ESP32-S3-WROOM-1-N16R8_C2913202.html, Item Type=Module, Manufacturer Part Number=ESP32-S3-WROOM-1-N16R8, Pricing 1="1=4.29000 (USD)", RoHS=No, Stock 1=423, Supplier 1=Digi-Key
U10: "IC RTC CLOCK/CALENDAR I2C 8SO", Case/Package=SO, LCSC Part Number=C80798, Manufacturer="NXP Semiconductors", Max Operating Temperature=85°C, Max Supply Voltage=5.5V, Min Operating Temperature=-40°C, Min Supply Voltage=1.8V, Temperature Grade=INDUSTRIAL, ComponentLink1Description=https://datasheet.ciiva.com/6668/pcf8563-6668170.pdf?src-supplier=Digikey, ComponentLink1URL=https://datasheet.ciiva.com/6668/pcf8563-6668170.pdf?src-supplier=Digikey, ComponentLink2Description=https://datasheet.ciiva.com/6668/pcf8563-6668166.pdf?src-supplier=Digikey, ComponentLink2URL=https://datasheet.ciiva.com/6668/pcf8563-6668166.pdf?src-supplier=Digikey, ComponentLink3Description=https://datasheet.ciiva.com/6668/pcf8563-6668174.pdf?src-supplier=Digikey, ComponentLink3URL=https://datasheet.ciiva.com/6668/pcf8563-6668174.pdf?src-supplier=Digikey, ComponentLink4Description=https://datasheet.ciiva.com/4771/pcf8563-4771994.pdf?src-supplier=Mouser, ComponentLink4URL=https://datasheet.ciiva.com/4771/pcf8563-4771994.pdf?src-supplier=Mouser, ComponentLink5Description=https://datasheet.ciiva.com/15225/getdatasheetpartid-633364-15225014.pdf?src-supplier=Verical, ComponentLink5URL=https://datasheet.ciiva.com/15225/getdatasheetpartid-633364-15225014.pdf?src-supplier=Verical, ComponentLink6Description=https://datasheet.ciiva.com/8144/pcf8563-8144541.pdf?src-supplier=Avnet, ComponentLink6URL=https://datasheet.ciiva.com/8144/pcf8563-8144541.pdf?src-supplier=Avnet, Interface=I2C, Item Type=IC, Lead Free="Lead Free", Logic Function=Clock, Manufacturer Part Number=PCF8563T/F4,118, Mounting Technology="Surface Mount", Nominal Supply Voltage=5.5V, Packaging="Tape and Reel", Pins=8, Pricing="2500=0.71 (USD)", Radiation Hardening=No, RoHS=Yes, RoHS Compliant=Yes, Stock=77500, Supplier="Future Electronics", Time Format=HH:MM:SS, Weight=0.019048oz
U13 U15 U17 U19: "OPTOISOLATOR 5.3KV TRANS 4SMD", LCSC Part Number=C5334420, Manufacturer=Vishay, ComponentLink1Description=https://datasheet.ciiva.com/18616/options-18616575.pdf?src-supplier=Digikey, ComponentLink1URL=https://datasheet.ciiva.com/18616/options-18616575.pdf?src-supplier=Digikey, Item Type=IC, Manufacturer Part Number=SFH617A-2X009T, Pricing="1=0.3234, 10=0.3216, 25=0.3197, 100=0.3179, 250=0.3161, 500=0.3142 (USD)", RoHS=Yes, Stock=871, Supplier="Arrow Electronics"
U21: "IC ADC 16BIT SIGMA-DELTA 10VSSOP", Case/Package=VSSOP, LCSC Part Number=C37593, Manufacturer="Texas Instruments", Max Operating Temperature=125°C, Max Supply Voltage=5.5V, Min Operating Temperature=-40°C, Min Supply Voltage=2V, Nominal Supply Current=150uA, Package Quantity=2500, Power Dissipation=900uW, Supplier Part Number=595-ADS1115IDGSR, Category="Analog to Digital Converters (ADCs)", ComponentLink1Description=https://datasheet.ciiva.com/4031/47725463s8438921n7713-4031028.pdf?src-supplier=Arrow+Electronics, ComponentLink1URL=https://datasheet.ciiva.com/4031/47725463s8438921n7713-4031028.pdf?src-supplier=Arrow+Electronics, Contact Plating=Gold, Conversion Rate=0.86KS/s, Height=1.07mm, Integral Nonlinearity (INL)=1LSB, Interface=I2C, Item Type=IC, Lead Free="Lead Free", Length=3mm, Manufacturer Part Number=ADS1115IDGSR, Max Supply Voltage (DC)=5.5V, Min Supply Voltage (DC)=2V, Number of A/D Converters=1, Number of Bits=16, Number of Channels=2, Number of Converters=1, Number of Inputs=4, Packaging="Tape and Reel", Pins=10, Polarity=Bipolar, Pricing="1=5.44, 10=4.76, 50=4.76, 100=4.01, 1000=2.88, 10000=2.78 (USD)", Reach SVHC Compliant=No, Resolution=16b, RoHS=Yes, RoHS Compliant=Yes, Sampling Rate=860S/s, Series=-, Stock=5925, Supplier=Mouser, Supply Type=Single, Thickness=1.02mm, Width=3mm
U26: "SOP-8 RS-485/RS-422 ICs ROHS", LCSC Part Number=C519086, Manufacturer=HGSEMI, Package=SOP-8, ComponentLink1Description=LCSC, ComponentLink1URL=https://www.lcsc.com/product-detail/RS-485-RS-422-ICs_HGSEMI-SP3485EIM-TR_C519086.html, Item Type=IC, Manufacturer Part Number=SP3485EIM/TR
X1: library part Q13MC14620001, "32.768kHz 7pF ±20ppm MC-146 Crystals ROHS", LCSC Part Number=C3013800, Manufacturer="Seiko Epson", Package=MC-146, ComponentLink1Description=LCSC, ComponentLink1URL=https://www.lcsc.com/product-detail/Crystals_Seiko-span-style-background-color-ff0-Epson-span-Q13MC14620001_C3013800.html, Item Type=Crystals, Manufacturer Part Number=Q13MC14620001

## Free pads (board coordinates)
  round 216.54 hole 122.05: MH1(157.85,4566.56) MH1(157.85,157.85) MH1(3385.46,4566.56) MH1(3385.46,157.85)
  round 1 smd: ""(164.35,164.35) ""(164.35,4560.06) ""(3378.96,4560.06) ""(3378.96,164.35)
  round 1 smd far side: ""(164.35,164.35) ""(164.35,4560.06) ""(3378.96,4560.06) ""(3378.96,164.35)

## Via types
v1: diameter 23.62, hole 11.81, Top Layer to Bottom Layer, tented both sides, 141 vias

## Nets (pads, with @x,y where several pads share a name; then routed paths per layer and width w, separated by ;. In a path a pad name is that pad's centre, name@x,y a point inside that pad or via, vN(x,y) a via of type N, cw(c..) or ccw(c..) an arc to the next point about the centre after c; other vN are vias at no path point)
3V3: C31.1 C32.2 C33.1 C45.1 C78.1 D5.2 D8.1 F3.2 FB1.2 J3.1 J4.2 Q4.1 R12.1 R28.2 R33.2 R34.2 R35.2 R36.2 R40.2 R41.2 R42.2 R43.2 R46.2 R64.2 R68.2 R72.2 R76.2 R117.1 TP3.1 U8.2 U26.8 | length 7087.4
  Top Layer w15: R72.2@187.6,3575.4 R72.2@188.2,3576 R76.2@605.47,3576 1230.92,3576 ; 296.42,2152.77 C32.2@296.42,2104 307.91,2115.5 C33.1@360.12,2115.5 ; v1(296.42,3065.6) 372.99,3065.6 ; U8.2@346.42,2214.66 346.61,2214.47 346.61,2152.96 346.8,2152.77 ; v1(503.86,2021) 541.52,2021 C31.1@550,2029.48 550,2053.59 539.59,2064 v1(503.86,2064) ; v1(646.42,2051.94) R35.2@693.42,2051.94 R40.2@749.42,2051.94 ; R34.2@799.42,2080.44 799.82,2080.03 799.82,2052.35 v1(800.23,2051.94) ; v1(846.42,2051.94) R33.2@846.42,2080.44 ; R64.2@1620,3576 1230.92,3576 ; J4.2@1801.41,3193.94 1801.41,3298.59 1760,3340 1260,3340 1230.92,3369.08 1230.92,3576 ; C45.1@2468.47,3874.91 C78.1@2723.6,3874.91 2781.53,3874.91 2787.81,3868.63 U26.8@2787.81,3865.97 ; v1(2570,2400) 2570,2446.49 D8.1@2572.14,2448.63 ; v1(2570.2,2057.8) v1@2570.6,2058.2 ; R46.2@2708.54,2709.06 v1(2740,2709.06) ; R117.1@2937.81,3925.01 2979.99,3925.01 cw(c2979.99,3905) 3000,3905 v1(3000,3874.82) ; R42.2@2967.73,2971.27 3248.96,2971.27 v1(3360,2971.26) ; TP3.1@3263.68,1558 R12.1@3330.24,1558
  Top Layer w30: v1(409.47,2021) R28.2@409.47,2050 ; v1(2570.2,2209.5) 2570.6,2209.1 v1@2570.6,2058.2
  Bottom Layer w30: v1(2570.2,2209.5) 2570.2,2399.8 v1(2570,2400) 2570,2637.8 cw(c2641.26,2637.8) 2641.26,2709.06 v1(2740,2709.06) 3305.67,2709.06 ccw(c3305.67,2763.39) 3360,2763.39 v1(3360,2971.26) 3360,3823.85 ccw(c3309.03,3823.85) 3309.03,3874.82 v1(3000,3874.82) v1(2685.79,3874.82)
  other v1: 2633.11,1557.6 3263.2,1558.48 2099.36,2026.8 2135.36,2026.8 2099.36,2062.8 2135.36,2062.8 284.42,2150.77 319.8,2150.77 347.26,2280.11 294.1,3556 333.24,3556
3V3-FIL: FB1.1 U21.1 U21.8 | length 189.5
  Top Layer w12: U21.8@2368.46,3798.39 2368.46,3864.49 2407.84,3903.86 U21.1@2407.84,3971.61
5V: C18.2 C27.1 C37.1 D9.2 D10.2 K1.8 K2.8 LED5.1 R7.1 R37.2 R60.2 R61.2 U3.1 U6.2 U6.7 | length 6207.8
  Top Layer w15: R60.2@1856.02,3535 v1(1856.02,3580) v1(2325.02,3580) R61.2@2325.02,3536.23 ; LED5.1@2219.12,1773.15 C37.1@2219.12,1855 ; v1(2220,1725) R37.2@2493.52,1725
  Top Layer w20: R7.1@1348.91,3413.72 v1(1856.02,3413.72) ; v1@1855,3580 v1(1856.02,3580) ; LED5.1@2219.12,1773.15 2219.56,1772.72 2219.56,1725.44 v1(2220,1725)
  Top Layer w25: D9.2@809.24,1736.37 859.45,1736.37 cw(c859.45,1700.26) 895.55,1700.26 895.55,1554.96 cw(c894.22,1554.96) 895.16,1554.02 cw(c894.22,1554.96) K1.8@894.22,1553.63 ; D10.2@1266.86,1736.37 1266.86,1600.67 ccw(c1313.9,1600.67) 1271.17,1581 ccw(c1313.9,1600.67) 1294.24,1557.93 ccw(c1313.9,1600.67) 1313.9,1553.63 K2.8@1436.84,1553.63
  Top Layer w30: v1(2295,1772.72) 2295,1825.15 cw(c2324.85,1825.15) 2324.85,1855 3365.21,1855 ccw(c3365.21,1919.79) 3430,1919.79 3430,3529.2 ccw(c3379.2,3529.2) 3379.2,3580 v1(3165,3580)
  Bottom Layer w20: v1(1856.02,3413.72) v1(1856.02,3580)
  Bottom Layer w30: v1(2325.02,3580) v1(3165,3580)
  other v1: 1755.67,578.87 1791.67,578.87 1827.67,578.87 1755.67,612.87 1791.67,612.87 1827.67,612.87 1823.99,1628.35 1869.99,1628.35 1823.99,1664.35 1869.99,1664.35
5V-PWR: D3.2 F2.2 R8.1 R17.2 R24.2 TP2.1 U6.3 U6.5 | length 2083.4
  Top Layer w10: v1(3263.68,1428.52) TP2.1@3264.17,1428.04
  Top Layer w15: TP2.1@3264.17,1428.04 R8.1@3330.24,1428.04
  Bottom Layer w25: v1(1990.64,664.35) 1990.64,1380.64 cw(c2038.52,1380.64) 2038.52,1428.52 v1(3263.68,1428.52)
24V: C8.2 D2.2 F1.2 TP1.1 U1.2 U1.3
485_DE: R123.1 U8.35 U26.3 | length 3335.2
  Top Layer w10: U8.35@546.42,2903.63 542.17,2907.88 542.17,2969.1 cw(c563.82,2969.1) 563.82,2990.74 797.2,2990.74 ccw(c797.2,3005.96) 812.42,3005.96 812.42,3084.49 v1(812.15,3084.75) ; U26.3@2887.81,3649.43 2887.81,3687.95 cw(c2904.86,3687.95) 2904.86,3705 2980,3705 cw(c2980,3690) 2995,3690 R123.1@2995,3584.2
  Top Layer w15: v1(2887.81,3510) U26.3@2887.81,3649.43
  Bottom Layer w10: v1(812.15,3084.75) 918.84,3084.75 2859.09,3084.76 ccw(c2859.09,3113.48) 2887.81,3113.48 v1(2887.81,3510)
485_RE: U8.34 U26.2 | length 2962.5
  Top Layer w10: U8.34@596.42,2903.63 596.42,2957.59 cw(c611.91,2957.59) 611.91,2973.09 823.61,2973.09 ccw(c823.61,2988.89) 839.42,2988.89 v1(839.42,3108.57)
  Top Layer w15: v1(2837.81,3510) U26.2@2837.81,3649.43
  Bottom Layer w10: v1(839.42,3108.57) 2811.6,3108.57 ccw(c2811.6,3134.78) 2837.81,3134.78 v1(2837.81,3510)
ADC_RDY: U8.6 U21.2 | length 3728.1
  Top Layer w10: v1(2387.93,4061.36) 2388.04,4061.25 2388.04,3971.73 U21.2@2388.15,3971.61
  Top Layer w15: U8.6@546.42,2214.66 v1(546.42,2279.26)
  Bottom Layer w15: v1(546.42,2279.26) 546.42,3669.01 cw(c577.4,3669.01) 577.4,3700 1815.08,3700 ccw(c1815.08,3744.92) 1860,3744.92 1860,4020.79 cw(c1900.57,4020.79) 1900.57,4061.36 v1(2387.93,4061.36)
AN0: D39.2 R80.1 R82.2 U21.4 | length 737.1
  Top Layer w10: U21.4@2348.78,3971.61 v1(2348.78,4030)
  Top Layer w20: R80.1@1883.58,3982.62 1916.53,3982.62 ; D39.2@1916.53,3894.01 1916.53,3982.62 ; 1916.69,3924.84 v1(1967.15,3924.84) ; R82.2@1949.49,3982.62 1916.53,3982.62
  Bottom Layer w15: v1(1967.15,3924.84) 1965.38,3993.3 1965.36,3993.89 cw(c2000.07,3995.26) 2000.07,4030 v1(2348.78,4030)
AN1: D43.2 R84.1 R86.2 U21.5 | length 511.9
  Top Layer w10: v1@2329.09,3895.63 U21.5@2329.09,3971.61
  Top Layer w20: R86.2@2014.52,3982.62 2047.47,3982.62 ; R84.1@2080.43,3982.62 2047.47,3982.62 ; v1(2097.93,3894.01) D43.2@2047.48,3894.01 2047.48,3982.61
  Bottom Layer w15: v1@2098.42,3894.5 v1@2327.97,3894.5
  Bottom Layer w20: v1(2097.93,3894.01) v1@2098.42,3894.5 ; v1@2327.97,3894.5 v1@2328.47,3895
  other v1: 2329.09,3895
ANALOG_IN_1: D37.2 J20.1 R80.2 | length 626.1
  Top Layer w20: D37.2@1765.96,4002.39 1765.96,4005.37 1803.2,4042.62 R80.2@1883.58,4042.62 1883.58,4519.04 J20.1@1873.92,4528.7
ANALOG_IN_2: D41.2 J20.2 R84.2 | length 624.8
  Top Layer w20: J20.2@2073.92,4528.7 2080.43,4522.19 R84.2@2080.43,4042.62 2160.8,4042.62 2198.05,4005.37 D41.2@2198.05,4002.44
BCK_BUT: C38.2 R40.1 SW5.3 SW5.4 U8.10 | length 2992.6
  Top Layer w15: U8.10@746.42,2214.66 749.42,2211.66 v1(749.42,2154.24) R40.1@749.42,2111.94 ; C38.2@2792.59,1778.21 v1(2825,1778.21) SW5.3@2888.6,1778.21 SW5.4@3246.86,1778.21
  Bottom Layer w15: v1(749.42,2154.24) 2779.22,2154.24 2781.82,2154.39 cw(c2784.24,2113.71) 2825,2113.71 v1(2825,1778.21)
DI_1: R64.1 U8.39 U13.4 | length 2284.9
  Top Layer w15: U8.39@346.42,2903.63 346.42,2839.98 ccw(c376.4,2839.98) 376.4,2810 v1(614.13,2810)
  Top Layer w20: v1@1617.47,3657.53 U13.4@1617.47,3678.47 ; R64.1@1620,3620.67 v1(1620,3655)
  Top Layer w25: U13.4@1617.47,3698 1620,3695.47 v1(1620,3655)
  Bottom Layer w15: v1(614.13,2810) 614.13,3623.02 cw(c646.11,3623.02) 646.11,3655 v1(1620,3655)
DI_2: R68.1 U8.38 U15.4 | length 1000
  Top Layer w15: U8.38@396.42,2903.63 397.94,2905.16 v1(397.94,2968.8)
  Top Layer w20: R68.1@398.2,3619.09 U15.4@398.2,3698
  Top Layer w25: U15.4@398.2,3698 v1@398.2,3760.93
  Bottom Layer w15: v1(397.94,2968.8) v1(397.94,3761.2)
DI_3: R72.1 U8.4 U17.4 | length 2030.4
  Top Layer w15: v1(445.29,2279.83) 445.85,2279.26 445.85,2215.22 U8.4@446.42,2214.66
  Top Layer w20: R72.1@188.2,3615.87 U17.4@188.2,3698
  Top Layer w25: U17.4@188.2,3698 188.2,3804.74 v1(188.47,3805)
  Bottom Layer w15: v1(188.47,3805) 189.41,3805.95 421.04,3805.95 cw(c421.04,3779.05) 447.94,3779.05 447.94,3029 445.29,3026.35 v1(445.29,2279.83)
DI_4: R76.1 U8.5 U19.4 | length 1787.2
  Top Layer w15: U8.5@496.42,2214.66 v1(496.42,2279.26)
  Top Layer w20: R76.1@605.47,3617.16 U19.4@605.47,3696.5
  Top Layer w25: U19.4@605.47,3698 v1@605.47,3760.93
  Bottom Layer w15: v1(496.42,2279.26) 496.42,3736.91 cw(c520.7,3736.91) 520.7,3761.2 v1(605.2,3761.2)
ENC_BUT: R43.1 SW7.D U8.20 | length 3743.7
  Top Layer w15: v1(855,2534.34) U8.20@992.63,2534.34 ; SW7.D@3167.73,2283.47 3167.73,2715.73 3248.03,2796.03 v1(3248.03,2893.71) R43.1@3248.03,2934.26
  Bottom Layer w10: v1(855,2534.34) 855,2963.65 cw(c879.19,2963.65) 879.19,2987.84 3228.82,2987.84 cw(c3228.82,2968.63) 3248.03,2968.63 v1(3248.03,2893.71)
ENC_CHA: R41.1 SW7.A U8.21 | length 2926.8